# Altium PCB Phaser.PcbDoc (part 15 of 16)
Units mm, origin at the board's own origin, x right, y up, seen from the top; angles counter-clockwise.
Board outline 161.99 x 100 mm, 6 copper layers (TopLayer, MidLayer1, MidLayer2, SignalLayer1, Internal Plane 1, BottomLayer), stack 1.528 mm thick; 1017 components, 665 nets, 3453 pads, 2223 vias.
Unrouted connection lines stored in the file: 1.
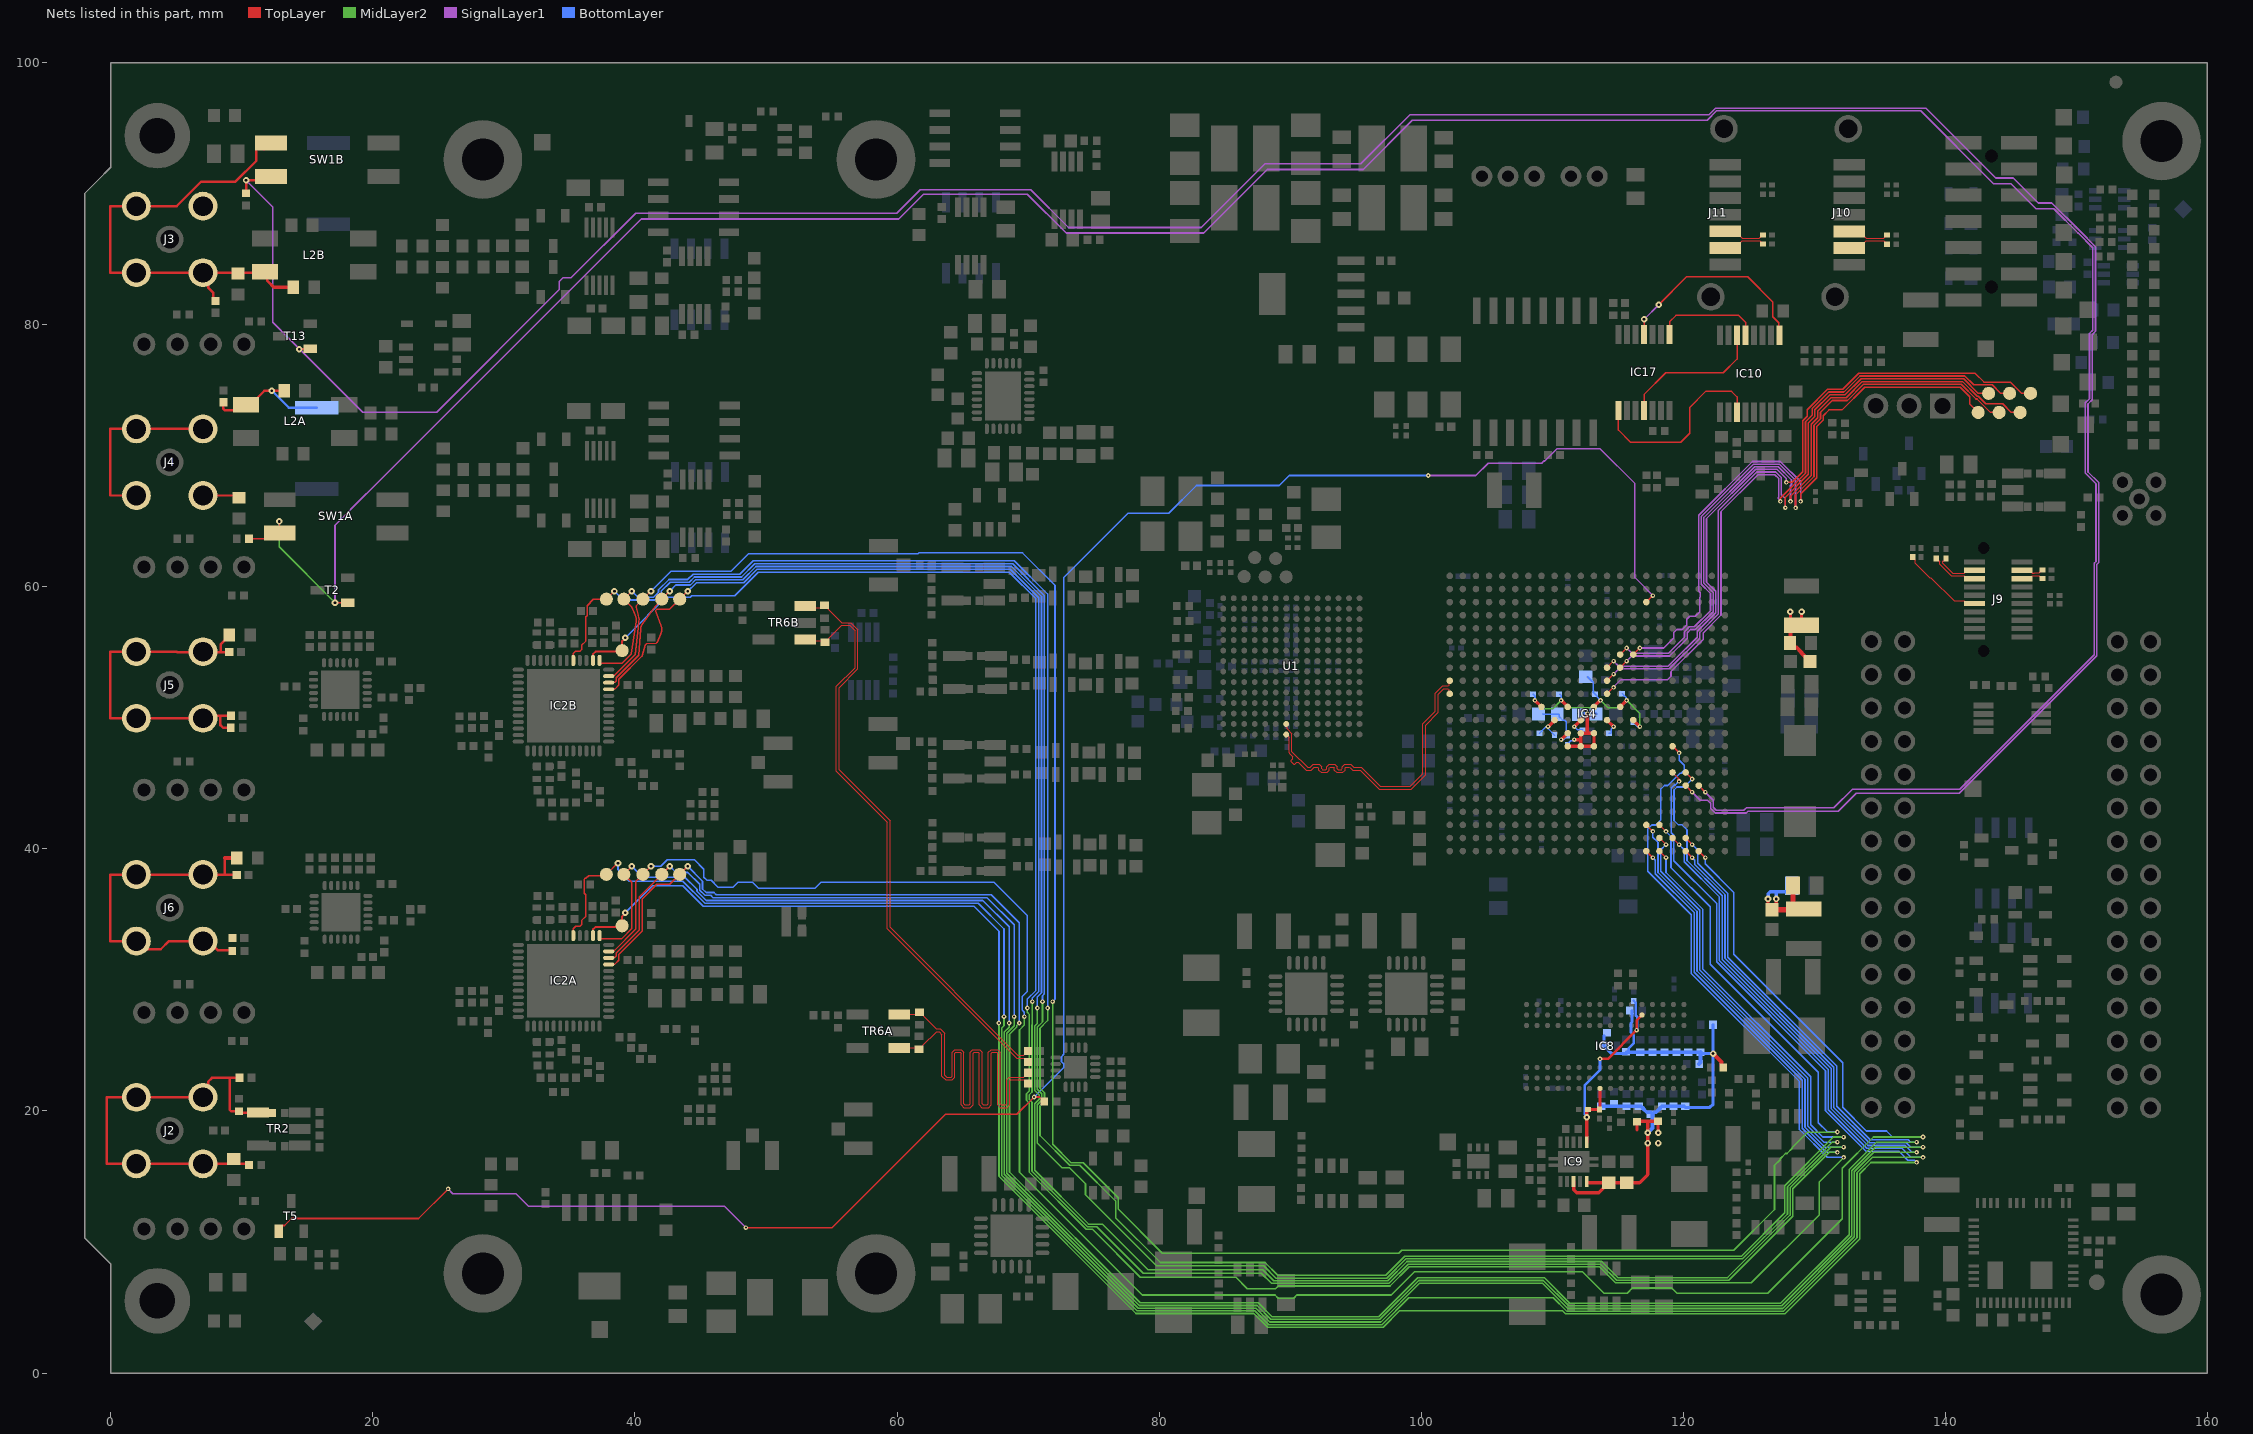
[diagram p17: the nets of this part, all layers, seen from the top]

## Via types
v1: diameter 0.5, hole 0.2, TopLayer to BottomLayer, tented both sides, 1374 vias
v2: diameter 0.35, hole 0.15, TopLayer to BottomLayer, tented both sides, 728 vias
v3: diameter 0.5, hole 0.2, TopLayer to BottomLayer, tented top, 96 vias
v4: diameter 0.6, hole 0.3, TopLayer to BottomLayer, 18 vias
v5: diameter 0.5, hole 0.2, TopLayer to BottomLayer, 5 vias
v6: diameter 0.35, hole 0.15, TopLayer to BottomLayer, 1 vias
v7: diameter 0.8, hole 0.5, TopLayer to BottomLayer, tented both sides, 1 vias

## Nets (pads, with @x,y where several pads share a name; then routed paths per layer and width w, separated by ;. In a path a pad name is that pad's centre, name@x,y a point inside that pad or via, vN(x,y) a via of type N, cw(c..) or ccw(c..) an arc to the next point about the centre after c; other vN are vias at no path point) (continued)
SATA_RX3_P: C198.1 J9.12 | length 6.3
  TopLayer w0.095: C198.1@137.498,62.253 137.498,62.228 137.706,62.021 137.706,61.795 138.803,60.698 138.891,60.698 140.671,58.917 141.418,58.917 141.625,58.71 J9.12@142.225,58.71
SATA_TX0_N: C206.1 J11.2 | length 3.2
  TopLayer w0.095: J11.2@123.2,85.85 123.955,85.85 124.5,86.394 125.818,86.394 C206.1@126.07,86.143
SATA_TX0_P: C205.1 J11.3 | length 3.2
  TopLayer w0.095: J11.3@123.2,87.12 123.954,87.12 124.496,86.578 125.806,86.578 C205.1@126.07,86.843
SATA_TX1_N: C202.1 J10.2 | length 3.2
  TopLayer w0.095: J10.2@132.675,85.845 133.43,85.845 133.975,86.389 135.293,86.389 C202.1@135.545,86.138
SATA_TX1_P: C197.1 J10.3 | length 3.2
  TopLayer w0.095: J10.3@132.675,87.115 133.429,87.115 133.971,86.573 135.281,86.573 C197.1@135.545,86.838
SATA_TX2_N: C188.1 J9.3 | length 1.8
  TopLayer w0.095: J9.3@145.825,61.25 146.425,61.25 146.633,61.043 146.768,61.043 146.783,61.058 147.172,61.058 147.379,61.266 C188.1@147.404,61.266
SATA_TX2_P: C187.1 J9.5 | length 1.8
  TopLayer w0.095: J9.5@145.825,60.615 146.425,60.615 146.633,60.822 146.859,60.822 146.874,60.838 147.172,60.838 147.379,60.631 C187.1@147.404,60.631
SATA_TX3_N: C201.1 J9.4 | length 3.3
  TopLayer w0.095: C201.1@140.049,62.168 140.049,62.143 139.897,61.99 139.84,61.99 139.784,61.935 139.784,61.806 140.548,61.043 141.418,61.043 141.625,61.25 J9.4@142.225,61.25
SATA_TX3_P: C200.1 J9.6 | length 3.7
  TopLayer w0.095: C200.1@139.299,62.168 139.299,62.143 139.452,61.99 139.509,61.99 139.564,61.935 139.564,61.715 140.457,60.822 141.418,60.822 141.625,60.615 J9.6@142.225,60.615
SC_MISO: IC10.5 IC17.8 | length 8.2
  TopLayer w0.115: IC17.8@118.95,79.25 118.95,80.225 119.43,80.705 124.225,80.705 124.745,80.185 IC10.5@124.745,79.2
SC_MOSI: IC10.6 IC17.4 | length 11.3
  TopLayer w0.115: IC17.4@117,73.45 117,74.675 118.65,76.325 123.05,76.325 124.095,77.37 IC10.6@124.095,79.2
SC_SCLK: IC10.11 IC17.1 | length 15
  TopLayer w0.115: IC17.1@115.05,73.45 115.05,71.95 115.975,71.025 119.802,71.025 120.482,71.705 120.482,73.682 121.7,74.9 123.675,74.9 124.095,74.48 IC10.11@124.095,73.3
SC_SSEL: IC10.1 IC17.11 | length 15.9
  TopLayer w0.115: IC17.11@117,79.25 v1(117,80.4) ; v1(118.123,81.523) 120.25,83.65 124.91,83.65 126.825,81.735 126.825,80.597 127.086,80.336 ; 127.087,80.336 127.282,80.142 127.282,79.263 IC10.1@127.345,79.2
  SignalLayer1 w0.115: v1(117,80.4) v1(118.123,81.523)
SG0: C37.1 J2.2 R14.2 R81.2 R150.2 R245.1 TR2.6 | length 33.5
  TopLayer w0.19: R14.2@9.39,16.322 R14.2@9.39,15.96 ; C37.1@9.84,22.528 9.067,22.528 ; R150.2@10.55,15.865 10.455,15.96 R14.2@9.39,15.96 ; TR2.6@11.21,19.845 9.91,19.845 R81.2@9.775,19.98 9.179,19.98 9.067,20.091 9.067,22.528 ; 9.067,22.528 7.728,22.528 7.425,22.225 7.425,21.968 7.296,21.84 7.04,21.84 J2.2@7.04,21.04 4.79,21.04 J2.2@1.96,21.04 -0.29,21.04 -0.29,15.96 J2.2@1.96,15.96 4.79,15.96 J2.2@7.04,15.96 R14.2@9.39,15.96
  TopLayer w0.3: TR2.6@11.21,19.845 12.101,19.845 R245.1@12.33,19.845
SG1: C11.1 J3.2 L2B.2 R98B.1 R156.2 SW1B.1 | length 36.7
  TopLayer w0.19: 5.04,83.96 J3.2@1.96,83.96 -0.04,83.96 -0.04,89.04 J3.2@1.96,89.04 5.04,89.04 6.905,90.905 9.52,90.905 11.118,92.503 SW1B.1@11.118,93.849 ; 5.055,83.975 J3.2@7.04,83.975 ; J3.2@7.04,83.96 J3.2@7.04,83.975 ; J3.2@7.733,83.975 9.625,83.975 R156.2@9.7,83.9 ; C11.1@8.006,81.8 7.83,81.975 7.83,82.412 7.425,82.818 7.425,83.373 7.04,83.757 J3.2@7.04,83.975 ; R156.2@9.7,83.96 11.588,83.96 11.7,83.96 L2B.2@11.775,84.035 11.681,84.035 11.588,84.035 11.681,83.941 11.93,83.693 11.93,83.368 12.265,83.033 ; SW1B.1@11.725,93.379 12.195,93.849 SW1B.1@12.225,93.849
  TopLayer w0.25: 12.265,83.033 12.448,82.85 R98B.1@13.925,82.85
SG2: C31.1 J4.2 L2A.1 R8A.1 R83A.2 R157.2 | length 26.2
  TopLayer w0.19: J4.2@1.96,66.96 -0.04,66.96 -0.04,72.04 J4.2@1.96,72.04 J4.2@6.736,72.04 ; J4.2@7.04,66.96 9.625,66.96 R157.2@9.791,66.794 ; C31.1@8.601,74.075 8.601,73.568 8.712,73.457 9.888,73.457 L2A.1@10.326,73.895 ; L2A.1@10.602,73.832 11.72,74.95 v1(12.301,74.95) R8A.1@13.236,74.95
  BottomLayer w0.19: v1(12.301,74.95) 13.595,73.655 R83A.2@15.725,73.655
SG3: C33.1 C34.2 J5.2 R151.2 R158.2 | length 26.6
  TopLayer w0.19: 5.04,55.04 J5.2@1.96,55.04 -0.04,55.04 -0.04,49.96 J5.2@1.96,49.96 5.04,49.96 7.106,49.96 7.296,50.15 8.369,50.15 ; 5.065,55.015 7.04,55.015 8.398,55.015 8.406,55.007 ; R158.2@9.04,56.306 9.04,56.256 8.406,55.622 8.406,55.007 ; C34.2@9.048,55.007 8.406,55.007 ; R151.2@9.145,49.236 8.57,49.236 8.369,49.436 8.369,50.15 ; C33.1@9.165,50.15 8.369,50.15
SG4: C35.1 C41.2 J6.2 R75.2 R160.2 | length 27.1
  TopLayer w0.19: J6.2@7.04,38.04 J6.2@7.04,38.015 ; 8.705,39.306 8.705,38.015 ; R75.2@9.271,32.2 9.194,32.277 8.156,32.277 7.473,32.96 4.442,32.96 3.82,32.338 2.039,32.338 1.445,32.932 -0.012,32.932 -0.04,32.96 -0.04,38.04 J6.2@1.96,38.04 5.04,38.04 5.065,38.015 J6.2@7.04,38.015 ; C35.1@9.62,38.015 8.705,38.015 ; J6.2@7.04,38.015 8.705,38.015
  TopLayer w0.3: 8.705,39.306 9.605,39.306 R160.2@9.612,39.314
SMA_CLK_SEL: IC4.T20 R165.1 T5.1 | length 164.6
  TopLayer w0.125: T5.1@12.825,10.825 12.825,10.995 13.087,11.258 13.258,11.258 13.793,11.793 23.488,11.793 v2(25.745,14.05) ; v2@48.46,11.098 55.051,11.098 63.695,19.741 69.144,19.741 v2(70.463,21.06) 70.878,21.06 70.98,20.957 71,20.957 71.228,20.73 R165.1@71.228,20.71 ; IC4.T20@117.175,58.825 v2(117.675,59.325)
  SignalLayer1 w0.125: v2(25.745,14.05) 26.108,13.688 30.92,13.688 31.883,12.725 46.838,12.725 v2(48.463,11.1) ; v2(100.535,68.489) 104.165,68.489 105.105,69.428 109.195,69.428 109.354,69.588 109.412,69.588 110.358,70.533 113.644,70.533 116.304,67.873 116.304,60.696 v2(117.675,59.325)
  BottomLayer w0.125: v2(70.463,21.06) 72.721,23.318 72.721,23.591 72.551,23.761 72.551,24.144 72.721,24.314 72.721,60.706 77.622,65.608 80.739,65.608 82.854,67.723 89.162,67.723 89.928,68.489 v2(100.535,68.489)
SYNC_N: IC4.A14 U1.B8 | length 23.2
  TopLayer w0.095: U1.B8@89.693,49.525 89.761,49.457 89.761,49.168 90.131,48.797 90.131,47.403 91.325,46.21 91.521,46.21 91.577,46.265 91.577,46.268 91.763,46.454 92.211,46.454 92.397,46.268 92.397,46.105 92.454,46.048 92.72,46.048 92.777,46.105 92.777,46.268 92.963,46.454 93.411,46.454 93.597,46.268 93.597,46.105 93.654,46.048 93.92,46.048 93.977,46.105 93.977,46.268 94.163,46.454 94.611,46.454 94.797,46.268 94.797,46.265 94.853,46.21 94.932,46.21 95.135,46.21 95.441,46.21 96.874,44.777 99.151,44.777 100.111,45.737 100.111,49.529 101.081,50.499 101.081,51.872 101.643,52.435 102.064,52.435 102.119,52.491 102.119,52.769 IC4.A14@102.175,52.825
SYNC_P: IC4.A13 U1.A8 | length 23.2
  TopLayer w0.095: U1.A8@89.693,48.721 89.911,48.503 89.911,47.312 89.945,47.278 90.012,47.211 90.214,47.01 90.214,46.875 90.078,46.739 90.078,46.659 90.266,46.471 90.346,46.471 90.482,46.606 90.617,46.606 90.875,46.348 90.909,46.314 91.233,45.99 91.325,45.99 91.613,45.99 91.797,46.174 91.797,46.177 91.854,46.234 92.12,46.234 92.177,46.177 92.177,46.014 92.363,45.828 92.811,45.828 92.997,46.014 92.997,46.177 93.054,46.234 93.32,46.234 93.377,46.177 93.377,46.014 93.563,45.828 94.011,45.828 94.197,46.014 94.197,46.177 94.254,46.234 94.52,46.234 94.577,46.177 94.577,46.174 94.762,45.99 94.932,45.99 95.135,45.99 95.35,45.99 96.783,44.557 99.242,44.557 100.331,45.646 100.331,49.438 101.301,50.408 101.301,51.781 101.734,52.215 102.064,52.215 102.119,52.159 102.119,51.881 IC4.A13@102.175,51.825
TERM_STAT0: IC4.W6 R29.2 SW1B.2 T13.1 | length 243.3
  TopLayer w0.125: IC4.W6@120.175,44.825 v2(120.675,44.325)
  TopLayer w0.127: v1(14.395,78.134) T13.1@15.025,78.134
  TopLayer w0.19: R29.2@10.326,90.03 v1(10.326,91.004) 11.92,91.004 SW1B.2@12.225,91.309
  SignalLayer1 w0.127: v1(10.326,91.004) 12.361,88.969 12.361,80.168 19.225,73.304 24.867,73.304 34.237,82.674 34.237,83.292 34.508,83.564 35.126,83.564 40.053,88.491 59.966,88.491 61.773,90.297 63.048,90.297 63.058,90.287 63.442,90.287 63.452,90.297 70.192,90.297 73.077,87.412 83.221,87.412 88.078,92.269 95.393,92.269 99.145,96.021 121.955,96.021 122.451,96.517 138.509,96.517 143.84,91.186 145.176,91.186 147.083,89.279 148.121,89.279 150.202,87.198 150.204,87.198 151.454,85.948 151.454,79.492 151.194,79.232 151.194,74.259 150.88,73.945 150.88,68.757 151.691,67.946 151.691,61.842 151.549,61.699 151.549,54.727 147.995,51.174 145.447,48.625 141.06,44.237 133.191,44.237 131.817,42.863 124.934,42.863 124.805,42.733 122.43,42.733 122.083,43.08 122.083,43.466 121.836,43.713 121.287,43.713 v2(120.675,44.325)
TERM_STAT1: IC4.Y6 R259.2 SW1A.2 T2.1 | length 240.2
  TopLayer w0.125: R259.2@10.555,63.662 12.471,63.662 SW1A.2@12.898,64.09 12.853,64.136 v1(12.853,64.979) ; IC4.Y6@121.175,44.825 v2(121.675,44.325)
  TopLayer w0.127: v1(17.115,58.785) v1@17.242,58.785 ; v1@17.252,58.776 v1@17.242,58.785 ; T2.1@18.079,58.793 18.071,58.785 v1@17.242,58.785
  MidLayer2 w0.125: v1(12.853,64.979) 12.853,63.048 v1(17.115,58.785)
  SignalLayer1 w0.127: v1(17.115,58.785) 17.115,64.698 19.511,67.093 19.513,67.093 40.483,88.064 60.143,88.064 62.019,89.939 69.946,89.939 72.9,86.985 83.398,86.985 88.254,91.842 95.57,91.842 99.322,95.594 121.816,95.594 122.535,96.314 138.109,96.314 143.663,90.759 144.999,90.759 146.907,88.852 148.261,88.852 150.118,86.994 150.12,86.994 151.251,85.864 151.251,79.576 150.991,79.316 150.991,74.343 150.677,74.029 150.677,68.672 151.488,67.861 151.488,61.926 151.345,61.783 151.345,54.811 141.085,44.55 132.9,44.55 131.488,43.137 124.821,43.137 124.62,42.936 122.514,42.936 122.287,43.164 122.287,43.713 v2(121.675,44.325)
TP0: B3.1 IC4.N15 | length 51.6
  TopLayer w0.125: IC4.N15@114.175,53.825 v2(114.675,54.325) ; v2(127.864,67.957) 127.87,67.963 128.305,67.963 129.112,68.769 129.112,72.668 129.445,73.001 129.445,73.507 131.005,75.067 132.164,75.067 133.392,76.295 142.257,76.295 142.937,75.615 144.951,75.615 145.816,74.75 B3.1@146.495,74.75
  SignalLayer1 w0.125: v2(114.675,54.325) 115.063,53.938 115.758,53.938 118.835,53.937 119.185,54.287 119.197,54.287 121.063,56.152 121.063,56.595 122.471,58.004 122.471,59.646 121.77,60.348 121.77,65.198 125.527,68.955 127.151,68.955 127.864,68.242 v2(127.864,67.957)
TP1: B4.1 IC4.P15 | length 52.1
  TopLayer w0.125: IC4.P15@115.175,53.825 v2(115.675,54.325) ; v2(128.175,66.51) 128.175,66.914 129.753,68.492 129.753,72.402 130.251,72.9 130.251,73.406 131.271,74.426 132.43,74.426 133.658,75.653 141.3,75.653 142.418,74.536 142.5,74.536 143.084,73.951 144.365,73.951 145.016,73.3 B4.1@145.695,73.3
  SignalLayer1 w0.125: v2(115.675,54.325) 116.063,54.713 118.949,54.713 120.288,56.051 120.288,56.486 120.538,56.736 120.919,56.736 122.27,58.087 122.27,59.563 121.568,60.264 121.568,65.281 125.444,69.156 127.234,69.156 128.252,68.139 128.252,67.797 128.175,67.72 v2(128.175,66.51)
TP2: B5.1 IC4.N13 | length 51.8
  TopLayer w0.125: IC4.N13@114.175,51.825 v2(114.675,52.325) ; v2(127.4,66.514) 127.4,66.744 129.325,68.669 129.325,72.58 129.823,73.077 129.823,73.583 131.094,74.853 132.253,74.853 133.48,76.081 141.478,76.081 142.157,75.401 143.565,75.401 144.216,74.75 B5.1@144.895,74.75
  SignalLayer1 w0.125: v2(114.675,52.325) 114.675,52.346 115.241,52.913 118.811,52.913 119.063,53.165 119.063,53.524 121.507,55.968 121.507,56.47 122.874,57.837 122.874,65.733 125.694,68.553 126.972,68.553 127.268,68.256 127.268,66.811 127.261,66.804 127.261,66.7 127.4,66.561 v2(127.4,66.514)
TP3: B6.1 IC4.P16 | length 51.3
  TopLayer w0.125: IC4.P16@115.175,54.825 v2(115.675,55.325) ; v2(128.563,66.022) 128.563,66.999 129.967,68.403 129.967,72.314 130.465,72.812 130.465,73.317 131.36,74.212 132.518,74.212 133.746,75.439 141.212,75.439 142.329,74.322 142.411,74.322 143.433,73.3 B6.1@144.095,73.3
  SignalLayer1 w0.125: v2(115.675,55.325) 116.086,54.914 118.866,54.914 120.086,56.134 120.086,56.569 120.455,56.938 120.836,56.938 122.069,58.171 122.069,59.479 121.367,60.181 121.367,65.364 125.36,69.358 127.317,69.358 128.563,68.113 v2(128.563,66.022)
TP4: B7.1 IC4.N14 | length 50.5
  TopLayer w0.125: IC4.N14@114.175,52.825 v2(114.675,53.325) ; v2@127.788,66.022 127.788,66.829 129.539,68.581 129.539,72.491 130.037,72.989 130.037,73.494 131.182,74.639 132.341,74.639 133.569,75.867 141.389,75.867 142.506,74.75 B7.1@143.295,74.75
  SignalLayer1 w0.125: v2(114.675,53.325) 115.086,53.736 115.63,53.736 118.931,53.736 121.264,56.069 121.264,56.512 122.672,57.921 122.672,65.816 125.61,68.754 127.055,68.754 127.47,68.34 127.47,67.021 127.788,66.703 v2(127.788,66.026)
TP5: B8.1 IC4.R16 | length 47.1
  TopLayer w0.125: IC4.R16@116.175,54.825 v2(116.675,55.325) ; v2(128.95,66.506) 128.95,67.084 130.181,68.315 130.181,72.225 130.679,72.723 130.679,73.052 131.117,73.49 132.1,73.49 133.835,75.226 141.123,75.226 141.86,74.489 141.86,73.935 B8.1@142.495,73.3
  SignalLayer1 w0.125: v2(116.675,55.325) 118.508,55.325 119.264,56.081 119.264,56.512 119.488,56.736 119.919,56.736 120.264,57.081 120.264,57.512 120.488,57.736 120.919,57.736 121.264,58.081 121.264,59.2 121.288,59.223 121.288,59.545 121.166,59.667 121.166,65.448 125.277,69.559 127.401,69.559 128.95,68.01 v2(128.95,66.506)
TRF0_CLK: B16B.1 IC2B.47 IC4.U3 | length 183
  TopLayer w0.115: IC2B.47@38,53.175 38.325,53.175 38.395,53.245 38.431,53.245 40.017,54.832 40.242,56.867 40.304,57.372 ccw(c39.3,57.495) 40.272,57.774 40.085,58.428 40.085,58.523 B16B.1@40.611,59.05 v1(41.226,59.664)
  TopLayer w0.125: IC4.U3@118.175,41.825 v2(118.675,41.325)
  MidLayer2 w0.125: v2(71.875,28.339) 71.875,17.446 73.267,16.054 74.198,16.054 76.877,13.374 76.877,12.513 80.246,9.144 98.279,9.144 98.51,9.374 123.845,9.374 126.953,12.483 126.953,15.847 127.388,16.282 127.388,16.342 127.796,16.75 127.904,16.75 128.313,17.158 128.313,17.207 129.468,18.363 131.717,18.363 v2(131.748,18.394)
  BottomLayer w0.125: v1(41.226,59.664) 42.746,61.184 47.336,61.184 48.656,62.503 61.603,62.503 61.678,62.579 69.575,62.579 72.051,60.103 72.051,28.525 71.875,28.349 v2(71.875,28.339) ; v2(118.675,41.325) 119.063,40.937 119.063,38.563 122.051,35.575 122.051,31.188 130.297,22.942 130.297,19.103 131.006,18.394 v2(131.748,18.394)
TRF0_DATA: B15B.1 IC2B.46 IC4.T3 | length 186.7
  TopLayer w0.115: IC2B.46@38,52.675 38.035,52.71 38.466,52.71 38.567,52.811 38.567,53.052 40.291,54.776 40.439,56.776 cw(c41.245,56.716) 40.591,57.19 41.4,58.306 B15B.1@42.05,59.05 v1(42.664,59.664)
  TopLayer w0.125: IC4.T3@117.175,41.825 v2(117.675,41.325)
  MidLayer2 w0.125: v2(70.713,27.855) 70.713,26.689 70.504,26.48 70.504,21.566 70.85,21.22 70.85,20.899 70.504,20.553 70.504,15.475 74.613,11.366 75.667,11.366 79.147,7.886 87.908,7.886 88.752,7.042 97.449,7.042 98.917,8.51 113.769,8.51 114.995,7.283 123.371,7.283 128.143,12.055 128.143,14.135 131.239,17.231 v2(132.233,17.231)
  BottomLayer w0.125: v1(42.664,59.664) 43.126,60.126 43.84,60.126 43.842,60.127 44.193,60.127 44.198,60.132 44.234,60.132 44.624,60.522 48.216,60.522 49.233,61.539 68.735,61.539 71.025,59.248 71.025,29.019 70.713,28.706 v2(70.713,27.855) ; v2(117.675,41.325) 117.675,40.885 118.066,40.494 118.066,38.195 121.039,35.222 121.039,30.671 129.285,22.425 129.285,18.758 130.812,17.231 v2(132.233,17.231)
TRF0_LD: B17B.1 IC2B.5 IC4.U2 | length 186.1
  TopLayer w0.102: 36.26,57.689 36.35,57.78 36.35,58.562 36.838,59.05
  TopLayer w0.115: IC2B.5@35.3,54.375 35.3,54.903 35.487,55.09 35.813,55.09 35.932,55.209 35.932,55.535 36.26,55.863 36.26,57.689 ; 36.838,59.05 B17B.1@37.823,59.05 v1(38.437,59.664)
  TopLayer w0.125: IC4.U2@118.175,40.825 v2(118.675,40.325)
  MidLayer2 w0.125: v2(71.1,28.339) 71.1,26.792 70.705,26.397 70.705,21.649 71.051,21.303 71.051,20.816 70.705,20.47 70.705,17.547 72.6,15.651 73.169,15.651 74.377,14.444 74.377,13.603 79.802,8.178 87.979,8.178 88.914,7.243 97.366,7.243 98.834,8.711 124.514,8.711 127.942,12.139 127.942,14.219 131.342,17.619 v2(131.748,17.619)
  BottomLayer w0.125: v1(38.437,59.664) 39.113,58.988 41.509,58.988 42.017,59.497 42.017,59.671 42.686,60.34 43.752,60.34 43.753,60.341 44.105,60.341 44.11,60.346 44.145,60.346 44.545,60.746 48.138,60.746 49.144,61.752 68.823,61.752 71.239,59.337 71.239,28.93 71.1,28.791 v2(71.1,28.339) ; v2(118.675,40.325) 118.28,39.93 118.28,38.284 121.253,35.311 121.253,30.759 129.499,22.513 129.499,18.847 130.722,17.623 v2@131.748,17.623
TRF0_LE: B14B.1 IC2B.45 IC4.T1 | length 184.8
  TopLayer w0.115: IC2B.45@38,52.175 38.026,52.201 38.476,52.201 38.771,52.496 38.771,52.943 40.541,54.713 40.575,54.747 40.788,55.557 40.874,55.643 41.615,55.67 41.701,55.756 41.982,56.388 ccw(c41.245,56.716) 42.006,56.985 41.604,58.126 41.604,58.222 41.671,58.289 42.658,58.289 B14B.1@43.419,59.05 v1(44.033,59.664)
  TopLayer w0.125: IC4.T1@117.175,39.825 v2(117.675,39.325)
  MidLayer2 w0.125: v2(70.325,28.339) 70.325,26.586 70.303,26.564 70.303,21.448 70.075,21.22 70.075,20.899 70.303,20.671 70.303,15.392 74.53,11.165 75.23,11.165 78.785,7.61 87.802,7.61 88.572,6.84 97.533,6.84 99.001,8.308 113.685,8.308 114.912,7.082 123.454,7.082 128.344,11.972 128.344,14.052 131.136,16.844 v2(131.748,16.844)
  BottomLayer w0.125: v1(44.033,59.664) 44.287,59.918 44.322,59.918 44.704,60.3 48.296,60.3 49.321,61.325 68.646,61.325 70.811,59.159 70.811,29.107 70.325,28.621 v2(70.325,28.339) ; v2(117.675,39.325) 117.675,39.317 117.852,39.139 117.852,38.106 120.825,35.134 120.825,30.582 129.071,22.336 129.071,18.67 130.897,16.844 v2(131.748,16.844)
TRF0_PS: B19B.1 IC2B.1 IC4.U1 | length 185
  TopLayer w0.115: IC2B.1@37.3,54.375 37.3,54.202 37.348,54.154 39.004,54.154 39.728,54.878 40.099,57.377 ccw(c39.3,57.495) 40.038,57.824 39.762,58.442 39.728,58.476 B19B.1@39.154,59.05 v1(39.769,59.664)
  TopLayer w0.125: IC4.U1@118.175,39.825 v2(118.675,39.325)
  MidLayer2 w0.125: v2(71.488,27.855) 71.488,26.895 70.906,26.314 70.906,21.733 71.252,21.387 71.252,20.732 70.906,20.386 70.906,18.13 73.184,15.853 73.946,15.853 76.676,13.123 76.676,11.86 80.1,8.437 88.077,8.437 89.053,7.46 97.299,7.46 98.751,8.912 124.431,8.912 127.741,12.222 127.741,14.302 131.445,18.006 v2(132.233,18.006)
  BottomLayer w0.125: v1(39.769,59.664) 40.231,59.202 41.42,59.202 41.803,59.585 41.803,59.76 42.597,60.554 43.663,60.554 43.664,60.555 44.016,60.555 44.021,60.56 44.039,60.56 44.44,60.96 48,60.96 49.028,61.988 68.939,61.988 71.488,59.44 v2(71.488,27.855) ; v2(118.675,39.325) 118.675,38.193 121.467,35.402 121.467,30.848 129.713,22.602 129.713,18.935 130.642,18.006 v2(132.233,18.006)
TRF0_RDBK: B18B.1 IC2B.2 IC4.V9 | length 195.1
  TopLayer w0.125: IC4.V9@119.175,47.825 119.18,47.825 119.68,47.325 v2(119.685,47.325)
  TopLayer w0.152: IC2B.2@36.8,54.375 36.818,54.393 36.818,54.877 36.994,55.053 38.953,55.053 B18B.1@39.025,55.125 39.025,55.846 39.268,56.089 v1(39.268,56.109)
  MidLayer2 w0.125: v2(69.938,27.855) 69.938,27.52 70.102,27.356 70.102,21.531 69.874,21.303 69.874,20.816 70.102,20.588 70.102,15.308 74.446,10.964 74.914,10.964 78.568,7.31 85.861,7.31 86.733,6.438 88.883,6.438 89.083,6.638 97.614,6.638 99.084,8.107 113.602,8.107 114.829,6.88 125.191,6.88 130.363,12.052 130.363,14.581 v2(132.233,16.451)
  BottomLayer w0.125: v1(39.268,56.109) 39.595,56.436 42.362,59.202 44.225,59.202 44.332,59.309 47.608,59.309 49.41,61.111 68.557,61.111 70.597,59.071 70.597,29.196 69.938,28.536 v2(69.938,27.855) ; v2(119.685,47.325) 119.685,46.756 120.072,46.369 120.072,45.991 119.845,45.764 119.74,45.764 118.808,44.833 118.559,44.833 118.288,44.561 118.288,42.217 117.885,41.815 117.585,41.815 117.288,41.518 117.288,38.3 120.611,34.976 120.611,30.494 128.857,22.248 128.857,18.581 130.982,16.456 v2@132.233,16.456
TRF1_CLK: B16A.1 IC2A.47 IC4.Y1 | length 172.9
  TopLayer w0.115: IC2A.47@38,32.175 38.325,32.175 38.395,32.245 38.431,32.245 40.051,33.865 40.051,37.489 B16A.1@40.611,38.05 v1(41.226,38.664)
  TopLayer w0.125: IC4.Y1@121.175,39.825 v2(121.675,39.325)
  MidLayer2 w0.125: v2(69.714,27.196) 69.714,26.549 69.341,26.177 69.341,15.314 78.702,5.953 88.843,5.953 89.083,5.712 90.267,5.712 90.507,5.953 97.718,5.953 99.491,7.727 112.311,7.727 113.943,6.095 115.716,6.095 116.108,6.488 119.117,6.488 119.509,6.095 126.439,6.095 132.124,11.78 132.124,15.626 134.507,18.01 137.959,18.01 137.963,18.006 138.278,18.006 v2(138.283,18.011)
  BottomLayer w0.125: v1(41.226,38.664) 41.975,38.664 42.477,39.167 44.54,39.167 45.255,38.451 45.255,37.838 45.502,37.591 45.815,37.591 46.345,37.062 47.482,37.062 47.865,37.445 48.973,37.445 49.424,36.995 53.746,36.995 54.197,37.445 67.403,37.445 69.93,34.918 69.93,29.112 69.55,28.732 69.55,27.694 69.714,27.53 v2(69.714,27.196) ; v2(121.675,39.325) 121.675,38.854 123.856,36.673 123.856,31.964 132.152,23.669 132.152,20.28 133.967,18.465 135.499,18.465 135.953,18.011 v2(138.283,18.011)
TRF1_DATA: B15A.1 IC2A.46 IC4.W1 | length 173.5
  TopLayer w0.115: IC2A.46@38,31.675 38.035,31.71 38.466,31.71 38.567,31.811 38.567,32.052 40.324,33.809 40.324,36.325 B15A.1@42.05,38.05 v1(42.664,38.664)
  TopLayer w0.125: IC4.W1@120.175,39.825 v2(120.675,39.325)
  MidLayer2 w0.125: v2(68.939,27.196) 68.939,26.491 68.38,25.933 68.38,15.255 78.484,5.151 87.473,5.151 88.527,4.097 96.839,4.097 99.808,7.065 109.32,7.065 111.257,5.129 127.499,5.129 132.85,10.479 132.85,15.446 134.638,17.235 137.959,17.235 137.963,17.231 v2(138.283,17.231)
  BottomLayer w0.125: v1(42.664,38.664) 43.133,38.196 44.037,38.196 44.947,37.287 44.947,36.849 45.343,36.452 45.781,36.452 45.963,36.271 66.871,36.271 68.939,34.203 v2(68.939,27.196) ; v2(120.675,39.325) 120.88,39.12 120.88,38.806 123.179,36.507 123.179,31.647 131.487,23.339 131.487,20.268 134.177,17.578 137.011,17.578 137.355,17.235 137.959,17.235 137.963,17.231 v2(138.283,17.231)
TRF1_LD: B17A.1 IC2A.5 IC4.V2 | length 177.2
  TopLayer w0.102: 36.26,36.487 36.129,36.617 36.129,37.679 36.189,37.739 36.26,37.739 36.485,37.964 37.737,37.964 B17A.1@37.823,38.05
  TopLayer w0.115: IC2A.5@35.3,33.375 35.3,33.903 35.487,34.09 35.813,34.09 35.932,34.209 35.932,34.535 36.26,34.863 36.26,36.487 ; B17A.1@37.823,38.05 38.685,38.913 v1(38.71,38.913)
  TopLayer w0.125: IC4.V2@119.175,40.825 v2(119.675,40.325)
  MidLayer2 w0.125: v2(68.164,27.196) 68.164,26.495 67.978,26.309 67.978,15.088 78.317,4.749 87.306,4.749 88.361,3.694 97.006,3.694 99.055,5.743 110.073,5.743 111.09,4.726 127.665,4.726 133.252,10.313 133.252,15.28 134.432,16.46 137.959,16.46 137.963,16.456 v2(138.283,16.456)
  BottomLayer w0.125: v1(38.71,38.913) 38.71,38.392 39.569,37.532 43.659,37.532 45.348,35.843 66.203,35.843 68.164,33.882 v2(68.164,27.196) ; v2(119.675,40.325) 120.063,39.937 120.063,39.019 122.751,36.33 122.751,31.47 131.059,23.162 131.059,20.091 133.999,17.151 136.679,17.151 137.37,16.46 137.959,16.46 137.963,16.456 v2(138.283,16.456)
TRF1_LE: B14A.1 IC2A.45 IC4.W2 | length 173.9
  TopLayer w0.115: IC2A.45@38,31.175 38.026,31.201 38.476,31.201 38.771,31.496 38.771,31.943 40.575,33.747 40.575,36.193 41.671,37.289 42.658,37.289 B14A.1@43.419,38.05 v1(44.033,38.664)
  TopLayer w0.125: IC4.W2@120.175,40.825 v2(120.675,40.325)
  MidLayer2 w0.125: v2@69.326,26.711 69.14,26.526 69.14,26.408 68.581,25.849 68.581,15.338 78.567,5.352 87.556,5.352 88.611,4.298 96.756,4.298 99.725,7.266 109.404,7.266 111.34,5.33 127.415,5.33 132.648,10.563 132.648,15.53 134.737,17.619 137.795,17.619 v2(137.799,17.622)
  BottomLayer w0.125: v1(44.033,38.664) 45.161,37.537 45.161,36.937 45.432,36.666 46.031,36.666 46.196,36.502 67.188,36.502 69.327,34.363 v2(69.327,26.711) ; v2(120.675,40.325) 121.094,39.906 121.094,38.895 123.393,36.596 123.393,31.735 131.701,23.427 131.701,20.357 134.265,17.792 137.156,17.792 137.33,17.619 137.795,17.619 v2(137.799,17.622)
TRF1_PS: B19A.1 IC2A.1 IC4.W7 | length 182
  TopLayer w0.115: IC2A.1@37.3,33.375 37.3,33.202 37.348,33.154 39.004,33.154 39.762,33.912 39.762,37.442 B19A.1@39.154,38.05 v1(39.769,38.664)
  TopLayer w0.125: IC4.W7@120.175,45.825 v2(120.675,45.325)
  MidLayer2 w0.125: v2(68.552,26.711) 68.552,26.389 68.179,26.016 68.179,15.171 78.4,4.95 87.389,4.95 88.444,3.895 96.923,3.895 99.891,6.864 109.237,6.864 111.174,4.927 127.582,4.927 133.051,10.396 133.051,15.363 134.531,16.844 137.795,16.844 v2(137.799,16.847)
  BottomLayer w0.125: v1(39.769,38.664) 40.6,37.833 43.812,37.833 44.733,36.912 44.733,36.76 45.436,36.057 66.537,36.057 68.552,34.042 v2(68.552,26.711) ; v2(120.675,45.325) 120.063,44.712 119.515,44.712 119.288,44.485 119.288,42.164 119.627,41.825 119.902,41.825 120.276,41.451 120.276,39.107 122.965,36.419 122.965,31.558 131.273,23.25 131.273,20.179 134.088,17.364 136.923,17.364 137.444,16.844 137.795,16.844 v2(137.799,16.847)
TRF1_RDBK: B18A.1 IC2A.2 IC4.V7 | length 176.3
  TopLayer w0.125: IC4.V7@119.175,45.825 119.632,45.368 119.632,45.195 v2(119.675,45.152)
  TopLayer w0.152: IC2A.2@36.8,33.375 36.818,33.393 36.818,33.877 36.994,34.053 38.953,34.053 B18A.1@39.025,34.125 39.025,34.846 39.268,35.089 v1(39.268,35.109)
  MidLayer2 w0.125: v2(67.777,26.711) 67.777,15.005 78.234,4.548 87.223,4.548 88.277,3.493 97.089,3.493 98.345,4.749 110.783,4.749 111.007,4.525 127.749,4.525 133.453,10.229 133.453,15.196 134.321,16.064 137.791,16.064 v2(137.799,16.072)
  BottomLayer w0.125: v1(39.268,35.109) 39.268,35.12 41.336,37.188 43.643,37.188 45.202,35.629 65.869,35.629 67.777,33.721 v2(67.777,26.711) ; v2(119.675,45.152) 119.651,45.152 119.373,44.873 119.309,44.873 119.074,44.638 119.074,41.229 119.276,41.026 119.276,39.084 122.537,35.823 122.537,31.381 130.845,23.073 130.845,20.002 133.911,16.937 136.427,16.937 137.122,16.242 137.613,16.242 137.783,16.072 v2(137.799,16.072)
UPC_REF_CLKA_N: C12.2 C281A.1 TR6A.1 | length 38
  TopLayer w0.095: TR6A.1@60.165,27.369 61.542,27.369 C281A.1@61.712,27.539 61.767,27.539 62.004,27.301 62.004,27.246 62.991,26.259 63.305,26.259 63.644,25.921 63.644,22.736 63.799,22.581 64.12,22.581 64.195,22.655 64.195,24.477 64.398,24.681 64.906,24.681 65.11,24.477 65.11,20.555 65.184,20.481 65.51,20.481 65.585,20.555 65.585,24.477 65.788,24.681 66.296,24.681 66.5,24.477 66.5,20.555 66.574,20.481 66.9,20.481 66.975,20.555 66.975,24.477 67.178,24.681 67.686,24.681 67.89,24.477 67.89,20.555 67.964,20.481 68.29,20.481 68.365,20.555 68.365,22.377 68.568,22.581 69.427,22.581 69.664,22.581 C12.2@69.993,22.91
UPC_REF_CLKA_P: C13.2 C280A.2 TR6A.3 | length 38
  TopLayer w0.095: TR6A.3@60.161,24.805 61.539,24.805 cw(c61.539,24.681) C280A.2@61.627,24.769 ; C280A.2@61.627,24.769 C280A.2@61.687,24.709 61.742,24.709 61.979,24.946 61.979,25.001 63.017,26.039 63.214,26.039 63.424,25.83 63.424,22.645 63.708,22.361 64.211,22.361 64.415,22.564 64.415,24.386 64.489,24.461 64.815,24.461 64.89,24.386 64.89,20.464 65.093,20.261 65.601,20.261 65.805,20.464 65.805,24.386 65.879,24.461 66.205,24.461 66.28,24.386 66.28,20.464 66.483,20.261 66.991,20.261 67.195,20.464 67.195,24.386 67.269,24.461 67.595,24.461 67.67,24.386 67.67,20.464 67.873,20.261 68.381,20.261 68.585,20.464 68.585,22.286 68.659,22.361 69.427,22.361 69.675,22.361 69.688,22.347 69.73,22.347 C13.2@69.993,22.085
UPC_REF_CLKB_N: C5.2 C281B.1 TR6B.1 | length 44.6
  TopLayer w0.095: TR6B.1@52.915,58.411 54.292,58.411 C281B.1@54.462,58.581 54.517,58.581 54.755,58.344 54.755,58.289 55.778,57.266 56.465,57.266 57.016,56.714 57.016,53.742 55.58,52.306 55.58,46.024 59.475,42.129 59.475,34.008 69.229,24.254 69.687,24.254 C5.2@69.993,24.56
UPC_REF_CLKB_P: C9.2 C280B.2 TR6B.3 | length 44.6
  TopLayer w0.095: TR6B.3@52.915,55.871 54.317,55.871 54.437,55.751 54.562,55.751 54.8,55.989 54.8,56.059 55.786,57.046 56.373,57.046 56.796,56.623 56.796,53.833 55.36,52.397 55.36,45.933 59.255,42.038 59.255,33.916 69.137,24.034 69.693,24.034 C9.2@69.993,23.735
VCCAUX: C59.2 C98.2 C111.2 C117.2 C118.2 C119.2 C219.2 C233.2 C235.2 IC4.H12 IC4.K12 IC4.M12 IC4.P12 IC4.R11 L26.2 | length 28.1
  TopLayer w0.25: v2(108.675,51.325) IC4.H12@109.175,50.825 ; v2(110.675,51.325) IC4.K12@111.175,50.825 ; IC4.M12@113.175,50.825 v2(113.675,51.325) ; IC4.P12@115.175,50.825 v2(115.675,51.325) ; IC4.R11@116.175,49.825 v2(116.675,49.325) ; L26.2@126.457,35.35 v1(126.457,36.175) ; L26.2@127.093,35.35 v1(127.093,36.175)
  TopLayer w0.4: L26.2@126.775,35.35 127.093,35.35 128.675,35.35 128.375,35.65 C59.2@128.375,37.2
  MidLayer2 w0.125: v2(108.675,51.325) 109.302,50.698 110.047,50.698 v2(110.675,51.325) 111.224,50.776 113.126,50.776 v2(113.675,51.325) 114.224,50.776 115.172,50.776 115.675,51.279 v2(115.675,51.325) 116.675,50.325 v2(116.675,49.325)
  BottomLayer w0.125: C117.2@108.525,51.8 108.537,51.8 108.675,51.663 v2(108.675,51.325) ; C118.2@110.571,51.8 110.675,51.696 v2(110.675,51.325) ; C233.2@113.017,52.783 112.675,53.125 112.708,53.125 113.12,52.712 113.12,51.939 113.257,51.801 113.282,51.801 113.42,51.664 113.42,51.58 v2(113.675,51.325) ; C219.2@115.325,51.825 115.35,51.825 115.488,51.688 115.632,51.543 115.632,51.368 v2(115.675,51.325) ; C119.2@116.175,49.675 116.525,49.325 v2(116.675,49.325)
  BottomLayer w0.25: v1(126.457,36.175) 126.468,36.185 126.468,36.569 126.614,36.715 127.093,36.715 ; v1(127.093,36.175) 127.093,36.715 ; C111.2@128.275,37.175 128.275,37.115 127.875,36.715 127.093,36.715
VCCBRAM: C56.2 C99.2 C120.2 C121.2 C122.2 C149.2 IC4.J11 IC4.L11 IC4.N11 L13.2 | length 11.8
  TopLayer w0.25: v2(109.675,49.325) IC4.J11@110.175,49.825 ; v2(111.675,49.325) IC4.L11@112.175,49.825 ; IC4.N11@114.175,49.825 v2(114.675,49.325) ; C56.2@128.17,57.06 v1(128.17,58.078) ; C56.2@129.019,57.06 v1(129.019,58.078)
  TopLayer w0.3: C149.2@128.139,55.753 128.139,55.703 128.464,55.378 128.617,55.378 129.009,54.987 129.009,54.945 L13.2@129.668,54.286 ; C149.2@128.183,55.753 C56.2@128.183,57.113 ; C56.2@129.019,57.06 129.325,57.06 C56.2@129.75,56.635
  BottomLayer w0.125: C99.2@109.025,48.825 109.525,49.325 v2(109.675,49.325) 109.675,49.175 C120.2@110.175,48.675 ; v2(111.675,49.325) 111.925,49.075 C121.2@112.3,49.075 ; C122.2@114.325,48.825 114.5,48.825 114.5,49.15 v2(114.675,49.325)
VREF_DDR3: C162.2 C163.2 C177.2 IC8.H1 IC8.M8 IC9.6 | length 17.4
  TopLayer w0.125: IC8.M8@116.841,27.32 IC8.M8@116.844,27.32
  TopLayer w0.2: v2(113.64,23.978) 114.245,23.978 v2(116.43,26.163) 116.43,26.359 116.43,26.681 116.43,26.909 IC8.M8@116.841,27.32 ; IC8.M8@116.832,27.333 IC8.M8@116.844,27.32
  TopLayer w0.25: IC9.6@112.628,17.612 v1(112.628,19.51) 112.628,20.036 112.703,20.111 C163.2@112.717,20.111 C177.2@113.592,20.111 113.641,20.16 IC8.H1@113.641,21.72
  BottomLayer w0.18: C162.2@116.215,28.403 116.38,28.238 116.38,27.273 116.484,27.169
  BottomLayer w0.2: v1(112.628,19.51) 112.628,19.591 112.478,19.741 112.478,21.966 113.64,23.128 v2(113.64,23.978) ; v2@116.484,26.217 116.484,27.169
VTT_DDR3: C173.2 C174.2 IC9.3 IC9.5 R99.2 R100.2 R101.2 R102.2 R103.2 R104.2 R105.2 R106.2 R107.2 R108.2 R109.2 R110.2 R111.2 R112.2 R113.2 R114.2 R115.2 R116.2 R117.2 R118.2 R119.2 R120.1 R121.1 | length 47.5
  TopLayer w0.2: R101.2@116.471,19.164 R101.2@116.509,19.202 ; R114.2@118.071,19.202 R114.2@118.19,19.083
  TopLayer w0.25: IC9.3@111.628,14.612 111.628,13.982 111.853,13.757 113.548,13.757 C174.2@114.303,14.512 ; IC9.5@112.628,14.612 112.728,14.512 C174.2@114.303,14.512 ; 116.471,18.573 R101.2@116.471,19.164 116.509,19.202 117.29,19.202 ; 118.071,18.611 R114.2@118.071,19.202 117.29,19.202 ; C174.2@114.303,14.512 C173.2@115.678,14.512 116.659,14.512 117.29,15.142 v1(117.29,17.549) v1(117.29,18.349) 117.29,19.202
  TopLayer w0.3: v1(122.265,24.378) 122.9,23.743 122.9,23.463 R106.2@123.06,23.303
  BottomLayer w0.2: R109.2@115.636,24.507 115.656,24.507 115.846,24.697 115.846,24.79 116.214,25.158 116.214,25.777 116.005,25.987 116.005,26.712 116.08,26.787 R100.2@116.08,27.657
  BottomLayer w0.25: R120.1@113.945,25.738 R121.1@113.945,24.978 114.545,24.378 R109.2@115.685,24.378 ; R109.2@115.79,24.483 R107.2@116.715,24.483 R115.2@117.64,24.483 R118.2@118.565,24.483 R113.2@119.47,24.483 R108.2@120.37,24.483 R105.2@121.315,24.483 121.42,24.378 v1(122.265,24.378) ; R112.2@120.04,20.358 120.134,20.264 122.025,20.264 122.265,20.504 v1(122.265,24.378) ; R111.2@122.26,26.578 122.265,26.573 v1(122.265,24.378)
  BottomLayer w0.3: R104.2@113.735,20.355 114.991,20.355 115.916,20.355 116.742,20.355 116.745,20.358 116.765,20.358 116.905,20.218 116.905,20.198 117.205,19.898 117.5,19.898 R116.2@117.64,19.758 ; v1(117.29,18.349) 117.64,18.699 R116.2@117.64,19.758 ; R119.2@118.206,20.218 118.206,20.198 117.906,19.898 117.78,19.898 R116.2@117.64,19.758 ; R119.2@118.366,20.358 119.14,20.358 R112.2@120.04,20.358 ; R110.2@121.21,23.578 121.315,23.683 R105.2@121.315,24.483
  other v1: 118.09,17.549 118.09,18.349
XADC_GND: C50.1 C51.1 IC4.K9 IC4.L9 IC4.L10 IC4.M9 IC4.M10 L5.2 | length 9.9
  TopLayer w0.25: IC4.K9@111.175,47.825 IC4.L9@112.175,47.825 ; v2(111.675,48.325) 112.175,48.325 ; v2(112.675,50.325) 112.675,48.825 ; IC4.L9@112.175,47.825 IC4.M9@113.175,47.825 IC4.M10@113.175,48.825 112.675,48.825 ; IC4.L9@112.175,47.825 112.175,48.325 ; 112.175,48.325 IC4.L10@112.175,48.825 112.675,48.825
  BottomLayer w0.075: C50.1@111.965,50.275 C50.1@112.015,50.325
  BottomLayer w0.125: C51.1@111.15,47.925 111.15,47.999 111.4,48.249 111.599,48.249 v2(111.675,48.325) ; v2@112.675,50.275 L5.2@113.425,50.275
  BottomLayer w0.25: C50.1@112.015,50.325 v2(112.675,50.325) L5.2@113.335,50.325
XADC_VCC: C50.2 C51.2 IC4.K10 L4.2 | length 4.7
  TopLayer w0.25: v2(110.675,48.325) IC4.K10@111.175,48.825
  BottomLayer w0.125: L4.2@109.275,50.275 C50.2@110.365,50.275 ; C50.2@110.525,50.225 110.525,50.075 110.777,49.822 110.928,49.822 110.937,49.813 110.946,49.813 111.062,49.696 111.062,48.713 C51.2@111.15,48.625 110.85,48.325 v2(110.675,48.325) ; C50.2@110.365,50.275 110.525,50.275 C50.2@110.365,50.275
pads on no net: D8.2 D9.2 FTG1.FTG2 FTG2.1 FTG3.1 FTG4.1 IC2A.14 IC2B.14 IC4.A15 IC4.A16 IC4.A20 IC4.A21 IC4.AA9 IC4.AA10 IC4.AA11 IC4.AA13 IC4.AA14 IC4.AA15 IC4.AA16 IC4.AB3 IC4.AB10 IC4.AB11 IC4.AB12 IC4.AB13 IC4.AB15 IC4.AB16 IC4.AB17 IC4.B20 IC4.B21 IC4.C20 IC4.D20 IC4.E3 IC4.F4 IC4.F15 IC4.F21 IC4.J16 IC4.N17 IC4.P17 IC4.P20 IC4.R17 IC4.T14 IC4.T15 IC4.T16 IC4.U15 IC4.U16 IC4.V10 IC4.V13 IC4.V14 IC4.V15 IC4.V22 IC4.W10 IC4.W11 IC4.W12 IC4.W14 IC4.W15 IC4.W16 IC4.Y4 IC4.Y11 IC4.Y12 IC4.Y13 IC4.Y14 IC4.Y16 IC4.Y17 IC5.8 IC6.5 IC8.J1 IC8.J9 IC8.L1 IC8.L9 IC8.M7 IC10.9 IC13.5 IC19.2 IC19.3 IC19.4 IC19.13 IC19.14 IC19.15 IC19.17 IC22.23 IC22.24 IC22.25 IC22.27 IC22.28 IC22.29 IC22.30 IC22.32 IC22.33 IC22.34 IC22.40 IC22.41 IC25.2 IC25.3 IC25.4 IC25.13 IC25.14 IC25.15 IC25.17 IC27.3 IC27.4 IC27.5 IC27.6 IC27.11 IC27.12 IC27.13 IC28.2 IC36.2 IC36.3 IC36.4 IC36.13 IC36.14 IC36.15 IC36.17 IC37.7 IC38.7 J8.12 J8.14 J8.15 J8.16 J9.16 J9.18 J9.P1 J9.P2 J10.MECH1 J10.MECH2 J11.MECH1 J11.MECH2 OSC2.1 T11.1 T11.2 T11.6 TR1.2 TR2.2 U1.L11

## Polygon pours and split planes (outlines as drawn)
no net on TopLayer "BAL_TOP" (solid, pour order 173): 6.096,98.273 159,98.273 159,3.226 6.096,3.226 6.096,8.2 2.774,8.2 -0.275,11.249 -0.275,78.75 2.212,81.237 2.212,92 6.096,92
P3V3 on TopLayer "P3V3_L01_P002" (solid, remove dead copper, pour order 2): 70.7,15.279 77.058,15.279 82.971,15.279 83.077,15.173 83.077,13.565 82.454,12.942 82.409,12.987 77.288,12.987 75.667,11.366 72.553,11.366 70.7,13.219
P1V8A on TopLayer "P1V8A_L01_P000" (solid, pour order 0): 70.906,18.786 76.093,18.786 76.093,15.513 70.001,15.513 69.675,15.839 69.675,16.555 70.102,16.982 70.102,18.588 70.303,18.789
P5V0A on TopLayer "P5V0A_L01_P028" (solid, remove dead copper, pour order 28): 36.9,10.32 30.38,10.32 30.38,18.478 33.312,18.478 36.775,18.478 36.9,18.353
SG4 on TopLayer "Top-No Net" (solid, remove dead copper, pour order 73): 10.341,39.099 10.341,31.099 -0.159,31.099 -0.159,40.6 10.341,40.6
SG3 on TopLayer "Top-No Net" (solid, remove dead copper, pour order 76): 10.065,55.94 10.065,47.94 -0.435,47.94 -0.435,57.6 10.065,57.6
SG1 on TopLayer "Top-No Net" (solid, remove dead copper, pour order 123): 8.5,90 8.5,82 -2,82 -2,91 8.5,91
SG2 on TopLayer "Top-No Net" (solid, remove dead copper, pour order 122): 10.326,72.994 10.326,64.994 -0.174,64.994 -0.174,74.728 10.326,74.728
SG0 on TopLayer "Top-No Net" (solid, remove dead copper, pour order 121): 10.341,14.04 -0.34,14.04 -0.34,23.04 10.341,23.04
P12V0 on TopLayer "P12V0_L01_P101" (solid, remove dead copper, pour order 101): 110.163,92.208 110.163,89.227 111.528,87.862 118.175,87.862 118.175,89.587 117.492,90.27 112.995,90.27 112.475,90.791 112.475,92.007 111.845,92.638 110.593,92.638
GND on TopLayer "GND_L01_P124" (solid, remove dead copper, pour order 124): 48.128,44.713 48.893,43.948 52.934,43.948 53.665,44.679 53.665,48.683 53.083,49.265 48.908,49.265 48.128,48.485
P1V0 on TopLayer "P1V0_L01_P008" (solid, remove dead copper, pour order 8): 21 vertices, not listed, extent 122.751,23.85 129.927,55.001
GND on TopLayer "GND_L01_P172" (solid, remove dead copper, pour order 172): 46.096,41.464 45.331,40.699 45.331,36.658 46.063,35.927 50.067,35.927 50.649,36.509 50.649,40.683 49.869,41.464
GND on TopLayer "GND_L01_P168" (solid, remove dead copper, pour order 168): 47.118,18.709 46.353,17.944 46.353,13.904 47.084,13.172 51.088,13.172 51.67,13.755 51.67,17.929 50.89,18.709
GND on TopLayer "GND_L01_P125" (solid, remove dead copper, pour order 125): 56.432,46.274 57.197,45.509 61.238,45.509 61.969,46.24 61.969,50.244 61.387,50.826 57.212,50.826 56.432,50.046
GND on TopLayer "GND_L01_P126" (solid, remove dead copper, pour order 126): 56.455,59.773 57.22,59.008 61.261,59.008 61.992,59.74 61.992,63.743 61.41,64.326 57.235,64.326 56.455,63.546
P12V0 on TopLayer "P12V0_L01_P036" (solid, remove dead copper, pour order 36): 23 vertices, not listed, extent 148.675,11.273 159,24.1
NetJ7_2 on TopLayer "NETJ7_2_L01_P128" (solid, remove dead copper, pour order 128): 151.881,64.776 152.884,63.772 156.448,63.772 158.255,65.579 158.255,67.909 156.324,69.84 153.173,69.84 151.881,68.548
P12V0S on TopLayer "P12V0S_L01_P048" (solid, remove dead copper, pour order 48): 17 vertices, not listed, extent 97.925,89.925 109.925,95.809
N12V0S on TopLayer "N12V0S_L01_P046" (solid, remove dead copper, pour order 46): 105.625,92.15 105.625,88.075 104.1,86.55 97.925,86.55 97.925,91.1 102.25,91.1 102.9,91.75 102.9,92.625 105.15,92.625
GND on TopLayer "GND_L01_P131" (solid, remove dead copper, pour order 131): 54.247,16.752 55.012,15.987 59.053,15.987 59.784,16.718 59.784,20.722 59.202,21.305 55.027,21.305 54.247,20.524
P1V2D on TopLayer "TopLayer-P1V2D" (solid, remove dead copper, pour order 166): 31 vertices, not listed, extent 88.529,29.946 103.542,44.64
P1V5A on TopLayer "P1V5A_L01_P100" (solid, remove dead copper, pour order 100): 45 vertices, not listed, extent 80.994,22.37 99.15,32.77
P1V2A on TopLayer "P1V2A_L01_P087" (solid, remove dead copper, pour order 87): 18 vertices, not listed, extent 87.921,29.93 92.879,36.112
P1V5 on TopLayer "P1V5_L01_P044" (solid, remove dead copper, pour order 44): 40 vertices, not listed, extent 80.994,11.725 111.366,28.472
P5V5A on TopLayer "P5V5A_L01_P020" (solid, remove dead copper, pour order 20): 17 vertices, not listed, extent 37.8,2.103 51.65,14.376
P2V5 on TopLayer "P2V5_L01_P086" (solid, remove dead copper, pour order 86): 30 vertices, not listed, extent 92.688,71.853 103.443,84.413
P3V3 on TopLayer "NONET_L-01_P-001" (solid, remove dead copper, pour order 167): 88.627,86.244 88.627,84.188 90.315,84.188 90.893,83.61 90.893,76.876 94.426,76.876 96.677,79.127 96.677,81.193 95.847,82.023 92.756,82.023 92.225,82.554 92.225,85.961 91.942,86.244
P3V6A on TopLayer "P3V6A_L01_P016" (solid, remove dead copper, pour order 16): 24 vertices, not listed, extent 62.242,2.102 74.375,9.43
P1V2A on TopLayer "P1V2A_L01_P084" (solid, remove dead copper, pour order 84): 89.612,66.248 90.94,66.248 96.408,66.248 96.408,63.113 95.077,61.781 90.982,61.781 90.219,62.544 90.219,64.856 90.154,64.921 89.567,64.921 89.347,65.141 89.347,65.982
P3V3_MP on TopLayer "P3V3_MP_L01_P141" (solid, remove dead copper, pour order 141): 25 vertices, not listed, extent 145.975,15.062 149.75,34.053
CLKVDD1.2 on TopLayer "CLKVDD1.2_L01_P140" (solid, remove dead copper, pour order 140): 82.857,48.094 86.013,48.094 86.013,47.127 86.583,46.557 86.583,44.263 86.054,43.734 82.364,43.734 82.124,43.975 82.124,47.36
P5V5 on TopLayer "P5V5_L01_P034" (solid, remove dead copper, pour order 34): 60 vertices, not listed, extent 114.6,2.775 144.225,20.15
P5V0A on TopLayer "NONET_L-01_P-001" (solid, remove dead copper, pour order 165): 63.35,78.627 65.095,78.627 66.629,77.092 66.629,76.003 66.64,75.992 66.612,75.965 64.237,75.965 63.35,76.851
P5V0A on TopLayer "P5V0A_L01_P157" (solid, remove dead copper, pour order 157): 30.026,43.079 30.026,39.064 28.02,39.064 25.696,41.388 25.696,49.352 25.993,49.645 27.201,49.631 27.201,48.242 27.201,47.54 27.201,45.903
P5V0A_D2SA on TopLayer "P5V0A_D2SA_L01_P155" (solid, remove dead copper, pour order 155): 26.196,29.42 26.196,28.754 26.275,28.675 28.912,28.675 29.219,28.981 31.495,28.981 31.625,29.112 31.625,29.209 31.415,29.42 26.226,29.42
P5V0A_MIXA on TopLayer "P5V0A_MIXA_L01_P146" (solid, remove dead copper, pour order 146): 20 vertices, not listed, extent 27.201,26.375 31.593,28.915
P5V0A_MIXB on TopLayer "P5V0A_MIXB_L01_P143" (solid, remove dead copper, pour order 143): 20 vertices, not listed, extent 27.201,47.375 31.593,49.915
P5V0A_D2SB on TopLayer "P5V0A_D2SB_L01_P142" (solid, remove dead copper, pour order 142): 26.196,50.42 26.196,49.754 26.275,49.675 28.912,49.675 29.219,49.981 31.495,49.981 31.625,50.112 31.625,50.209 31.415,50.42 26.226,50.42
GND on TopLayer "GND_L01_P132" (solid, remove dead copper, pour order 132): 14.454,39.064 20.704,39.064 20.704,40.564 14.454,40.564 14.454,39.064
XADC_GND on TopLayer "XADC_GND_L01_P100" (solid, remove dead copper, pour order 104): 112.498,50.64 112.39,50.532 112.39,49.948 110.517,48.075 110.518,47.305 110.678,47.144 113.652,47.144 113.907,47.398 113.907,49.093 112.962,50.038 112.962,50.52 112.841,50.64
P3V3 on TopLayer "P3V3_L01_P095" (solid, remove dead copper, pour order 95): 108.629,17.155 108.329,17.454 108.329,18.975 109.081,19.727 111.845,19.727 112.361,19.211 112.361,17.155
VTT_DDR3 on TopLayer "VTT_DDR3_L01_P089" (solid, remove dead copper, pour order 89): 111.366,15.179 111.366,13.783 111.669,13.48 113.25,13.48 113.813,12.917 118.335,12.917 118.335,19.637 116.165,19.637 116.001,19.472 116.001,17.442 116.471,16.972 116.471,15.669 116.203,15.401 113.308,15.401 113.086,15.179
AVDD33 on TopLayer "AVDD33_L01_P083" (solid, remove dead copper, pour order 83): 27 vertices, not listed, extent 81.2,61.284 85.8,69.001
N11V5A on TopLayer "N11V5A_L01_P071" (solid, remove dead copper, pour order 71): 41 vertices, not listed, extent 23.909,70.235 39.55,82.675
P11V5A on TopLayer "P11V5A_L01_P070" (solid, remove dead copper, pour order 70): 23 vertices, not listed, extent 36.975,89.13 50.075,95.7
P12V0A on TopLayer "P12V0A_L01_P055" (solid, remove dead copper, pour order 55): 86.425,95.784 86.425,91.259 78.25,91.259 78.25,95.059 78.975,95.784 80.575,95.784 80.575,93.969 81.025,93.519 82.985,93.519 83.25,93.784 83.25,95.784
N12V0A on TopLayer "N12V0A_L01_P054" (solid, remove dead copper, pour order 54): 86.425,86.575 86.425,91.1 78.25,91.1 78.25,87.3 78.975,86.575 80.575,86.575 80.575,88.39 81.025,88.84 82.985,88.84 83.25,88.575 83.25,86.575
P12V0F on TopLayer "P12V0F_L01_P052" (solid, remove dead copper, pour order 52): 95.225,95.809 94.825,95.409 94.825,93.359 94.6,93.134 93.275,93.134 92.825,93.584 90.125,93.584 89.807,93.901 89.807,95.426 89.45,95.784 86.725,95.784 86.725,91.25 97.725,91.25 97.725,95.809
N12V0F on TopLayer "N12V0F_L01_P050" (solid, remove dead copper, pour order 50): 95.225,86.55 94.825,86.95 94.825,89 94.6,89.225 93.275,89.225 92.825,88.775 90.125,88.775 89.807,88.457 89.807,86.932 89.45,86.575 86.725,86.575 86.725,91.105 97.725,91.105 97.725,86.55
P5V5 on TopLayer "P5V5_L01_P042" (solid, remove dead copper, pour order 42): 18 vertices, not listed, extent 87.175,2.75 103.03,13.775
NetC341_1 on TopLayer "NETC341_1_L01_P026" (solid, remove dead copper, pour order 26): 113.65,5.9 114.45,5.9 114.45,2.779 106.191,2.779 105.448,3.521 105.448,6.326 105.997,6.875 110.148,6.875 110.798,6.225 112.325,6.225 112.65,5.9 112.65,5.395 112.77,5.275 113.53,5.275 113.65,5.395
P3V3A on TopLayer "P3V3A_L01_P014" (solid, remove dead copper, pour order 14): 25 vertices, not listed, extent 63.499,11.45 69.9,19.425
P1V8 on TopLayer "P1V8_L01_P119" (solid, remove dead copper, pour order 119): 118.525,12.917 122.542,12.917 123.15,13.525 123.15,15.587 122.351,16.387 122.351,18.792 121.792,19.351 119.984,19.351 119.665,19.032 119.665,18.457 119.391,18.183 119.054,18.183 118.525,17.654
VCCAUX on TopLayer "VCCAUX_L01_P117" (solid, remove dead copper, pour order 117): 130.619,34.622 130.893,34.896 130.893,36.007 130.571,36.33 129.65,36.33 129.325,36.655 129.325,38.078 128.645,38.758 127.552,38.758 126.225,37.431 126.225,34.715 126.318,34.622
P5V5 on TopLayer "P5V5_L01_P022" (solid, remove dead copper, pour order 22): 52,2.103 52,8.886 55.708,8.886 ccw(c58.366,7.567) 58.366,4.601 ccw(c58.366,7.796) 60.799,5.725 62.1,5.725 62.6,5.225 62.6,4.6 62.6,2.103
P3V3 on TopLayer "P3V3_L01_P040" (solid, remove dead copper, pour order 40): 109.622,7.222 101.619,7.222 101.125,7.716 101.125,11.549 110.962,11.549 111.592,12.179 114.006,12.179 114.325,11.86 114.325,9.573 113.925,9.174 111.184,9.174 110.894,8.884 110.894,8.494
NetC261_1 on TopLayer "NETC261_1_L01_P032" (solid, remove dead copper, pour order 32): 21 vertices, not listed, extent 84.473,10.545 93.475,15.125
NetC333_1 on TopLayer "NETC333_1_L01_P024" (solid, remove dead copper, pour order 24): 22 vertices, not listed, extent 117.773,8.545 126.925,12.6
P3V6 on TopLayer "P3V6_L01_P012" (solid, remove dead copper, pour order 12): 23 vertices, not listed, extent 73.892,2.68 85.17,12.827
NetC345_1 on TopLayer "NETC345_1_L01_P010" (solid, remove dead copper, pour order 10): 18 vertices, not listed, extent 78.992,2.103 87.35,6.35
NetC254_1 on TopLayer "NETC254_1_L01_P006" (solid, remove dead copper, pour order 6): 25 vertices, not listed, extent 125.25,19.05 131.775,27.8
GND on TopLayer "GND_L01_P004" (solid, remove dead copper, pour order 4): 14.404,56.06 20.654,56.06 20.654,57.56 14.404,57.56 14.404,56.06
GND on MidLayer2 "GND_L03_P151" (solid, remove dead copper, pour order 151): 20 vertices, not listed, extent 23.078,20.611 65.126,64.213
no net on MidLayer2 "ML2_BAL" (solid, pour order 169): 1.549,98.098 158.521,98.276 158.521,3.111 1.549,2.935
P3V3 on MidLayer2 "P3V3_L03_P118" (solid, remove dead copper, pour order 118): 46 vertices, not listed, extent 77.648,9.525 147.808,87.467
P12V0 on MidLayer2 "P12V0_L03_P077" (solid, remove dead copper, pour order 77): 17 vertices, not listed, extent 110.1,15.825 159,93
P3V3A on MidLayer2 "P3V3A_L03_P150" (solid, remove dead copper, pour order 150): 31 vertices, not listed, extent 62.664,17.1 91.387,72.496
P1V0 on MidLayer2 "P1V0_L03_P115" (solid, remove dead copper, pour order 115): 42 vertices, not listed, extent 97.901,41.333 139.945,80.244
P2V5 on MidLayer2 "MidLayer2-P2V5" (solid, remove dead copper, pour order 163): 50 vertices, not listed, extent 63.667,46.325 139.672,83.212
P1V2A on MidLayer2 "MidLayer2-P1V2A" (solid, remove dead copper, pour order 159): 28 vertices, not listed, extent 85.058,33.978 99.108,66.352
CLKVDD1.2 on MidLayer2 "CLKVDD1.2_L03_P079" (solid, remove dead copper, pour order 79): 86.479,44.752 85.194,44.753 83.89,46.057 83.89,56.38 84.376,56.867 86.695,56.867 87.141,56.42 87.141,45.415
P1V2A on MidLayer2 "NONET_L-01_P-001" (solid, remove dead copper, pour order 161): 87.33,51.311 87.33,46.919 88.187,46.919 88.187,43.5 89.737,41.949 91.7,41.949 92.402,41.247 93.743,42.588 93.743,42.768 91.688,42.768 89.845,44.611 89.845,50.973 89.03,51.788
P11V5A on MidLayer2 "P11V5A_L03_P068" (solid, remove dead copper, pour order 68): 21 vertices, not listed, extent 34.337,65.684 40.25,91.925
P5V0A on MidLayer2 "P5V0A_L03_P145" (solid, remove dead copper, pour order 145): 26 vertices, not listed, extent 49.608,68.325 76.3,94.4
P5V0A on MidLayer2 "P5V0A_L03_P144" (solid, remove dead copper, pour order 144): 38 vertices, not listed, extent 14.072,14.85 36.451,60.926
NetC330_2 on MidLayer2 "NETC330_2_L03_P064" (solid, remove dead copper, pour order 64): 151.825,10.225 147.65,10.225 144.425,13.45 144.425,14.475 144.45,14.475 144.775,14.8 144.8,14.775 146.126,14.775 148.876,12.025 151.55,12.025 152.15,11.425 152.15,10.55
REF_P2V048 on MidLayer2 "REF_P2V048_L03_P072" (solid, remove dead copper, pour order 72): 65.698,82.944 46.995,82.944 45.001,80.95 45.001,78.978 45.527,78.452 49.276,78.452 52.149,81.325 66.405,81.325 69.355,84.275 69.355,85.195 69.091,85.459 68.274,85.459